# Altium PCB GNT604PWRR4.PCBDOC
Units mm, origin at the board's own origin, x right, y up, seen from the top; angles counter-clockwise.
Board outline 63 x 65.47 mm, 2 copper layers (Top Layer, Bottom Layer); 38 components, 26 nets, 112 pads, 11 vias.
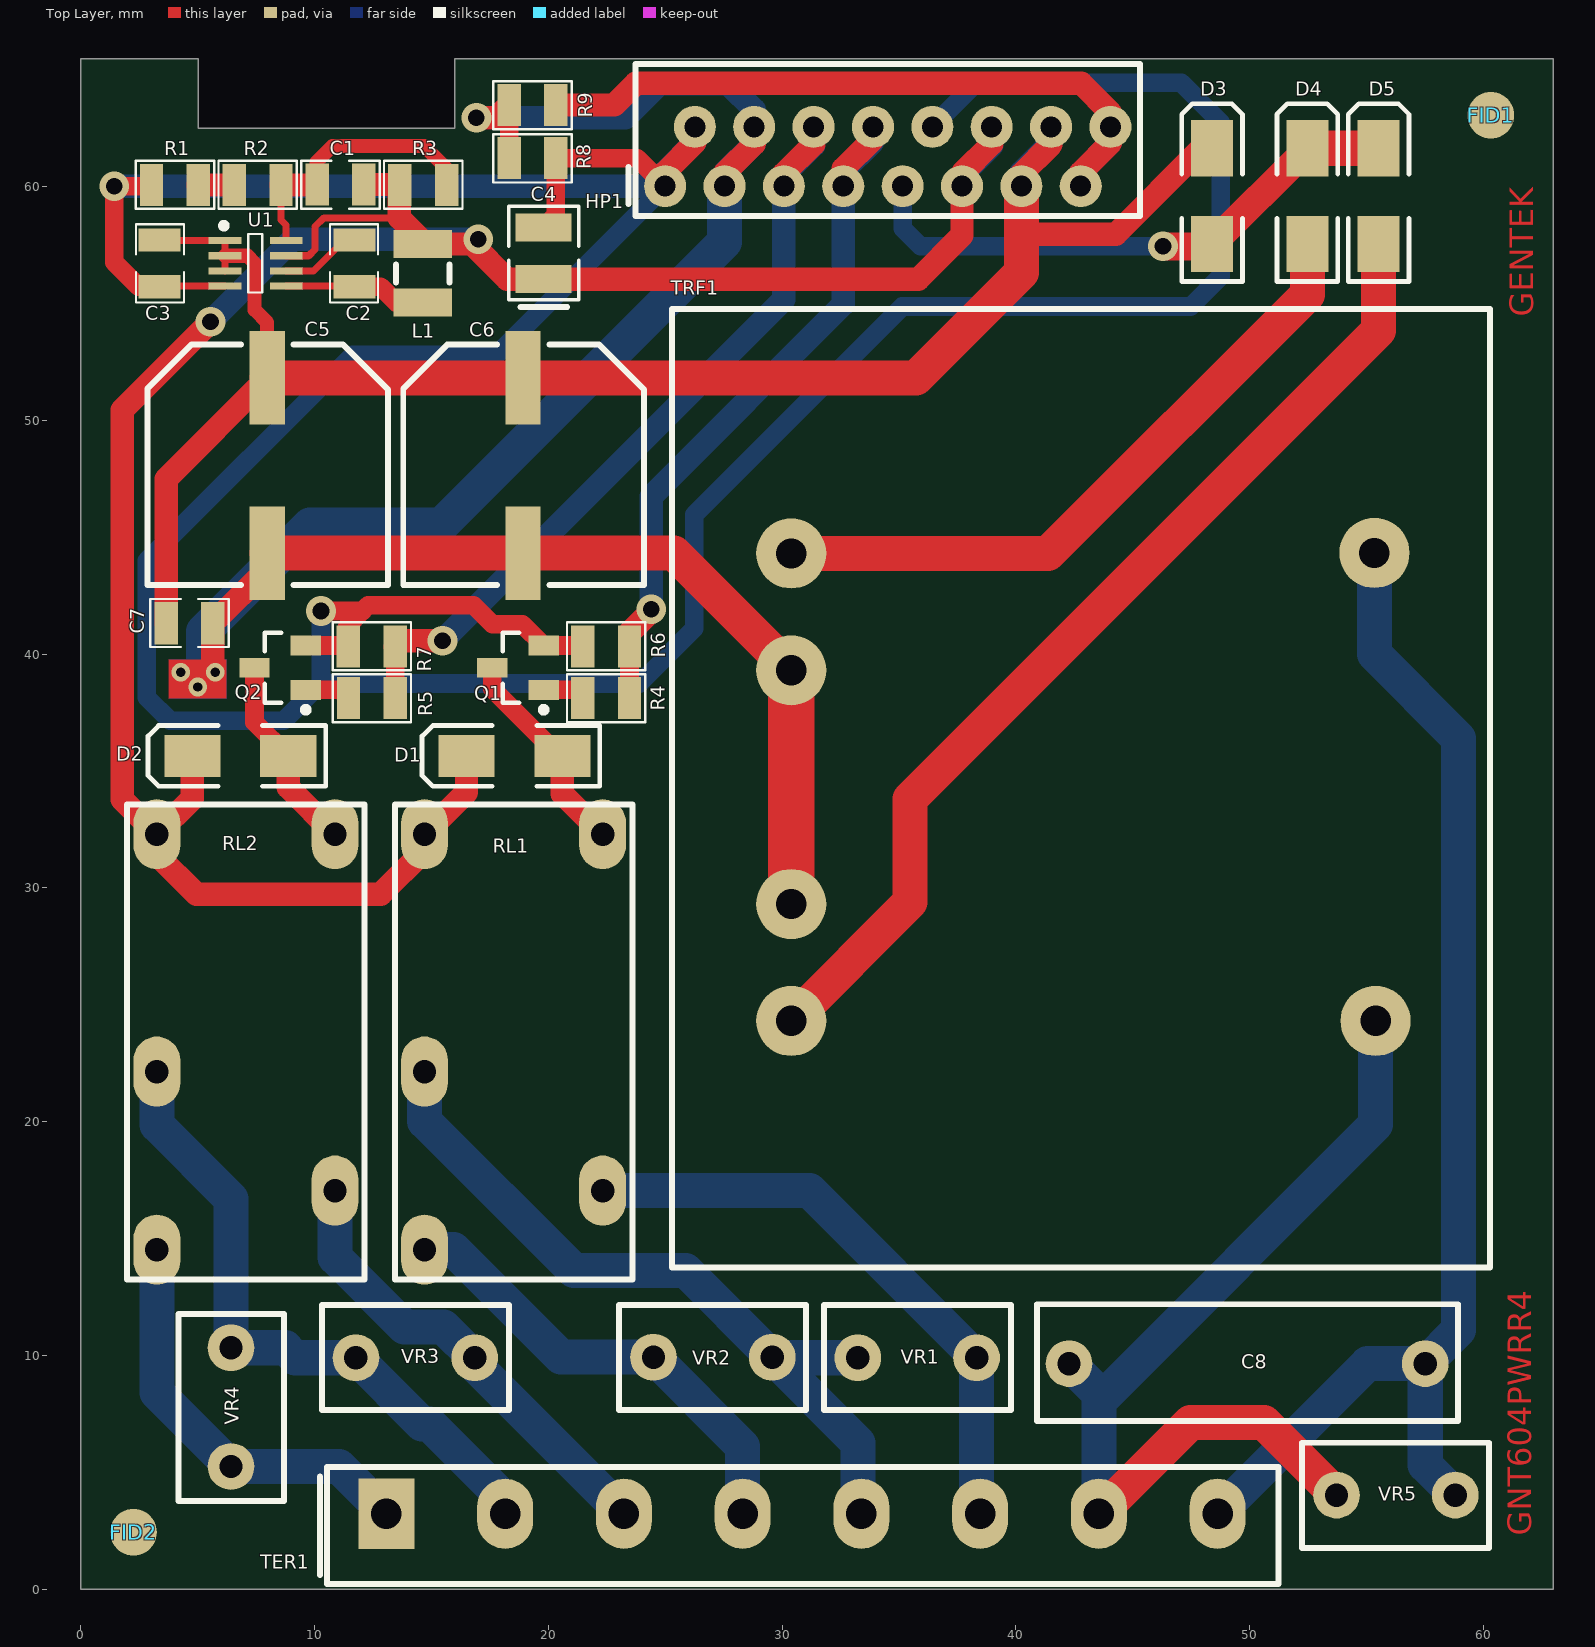
[diagram p0: Top Layer view]
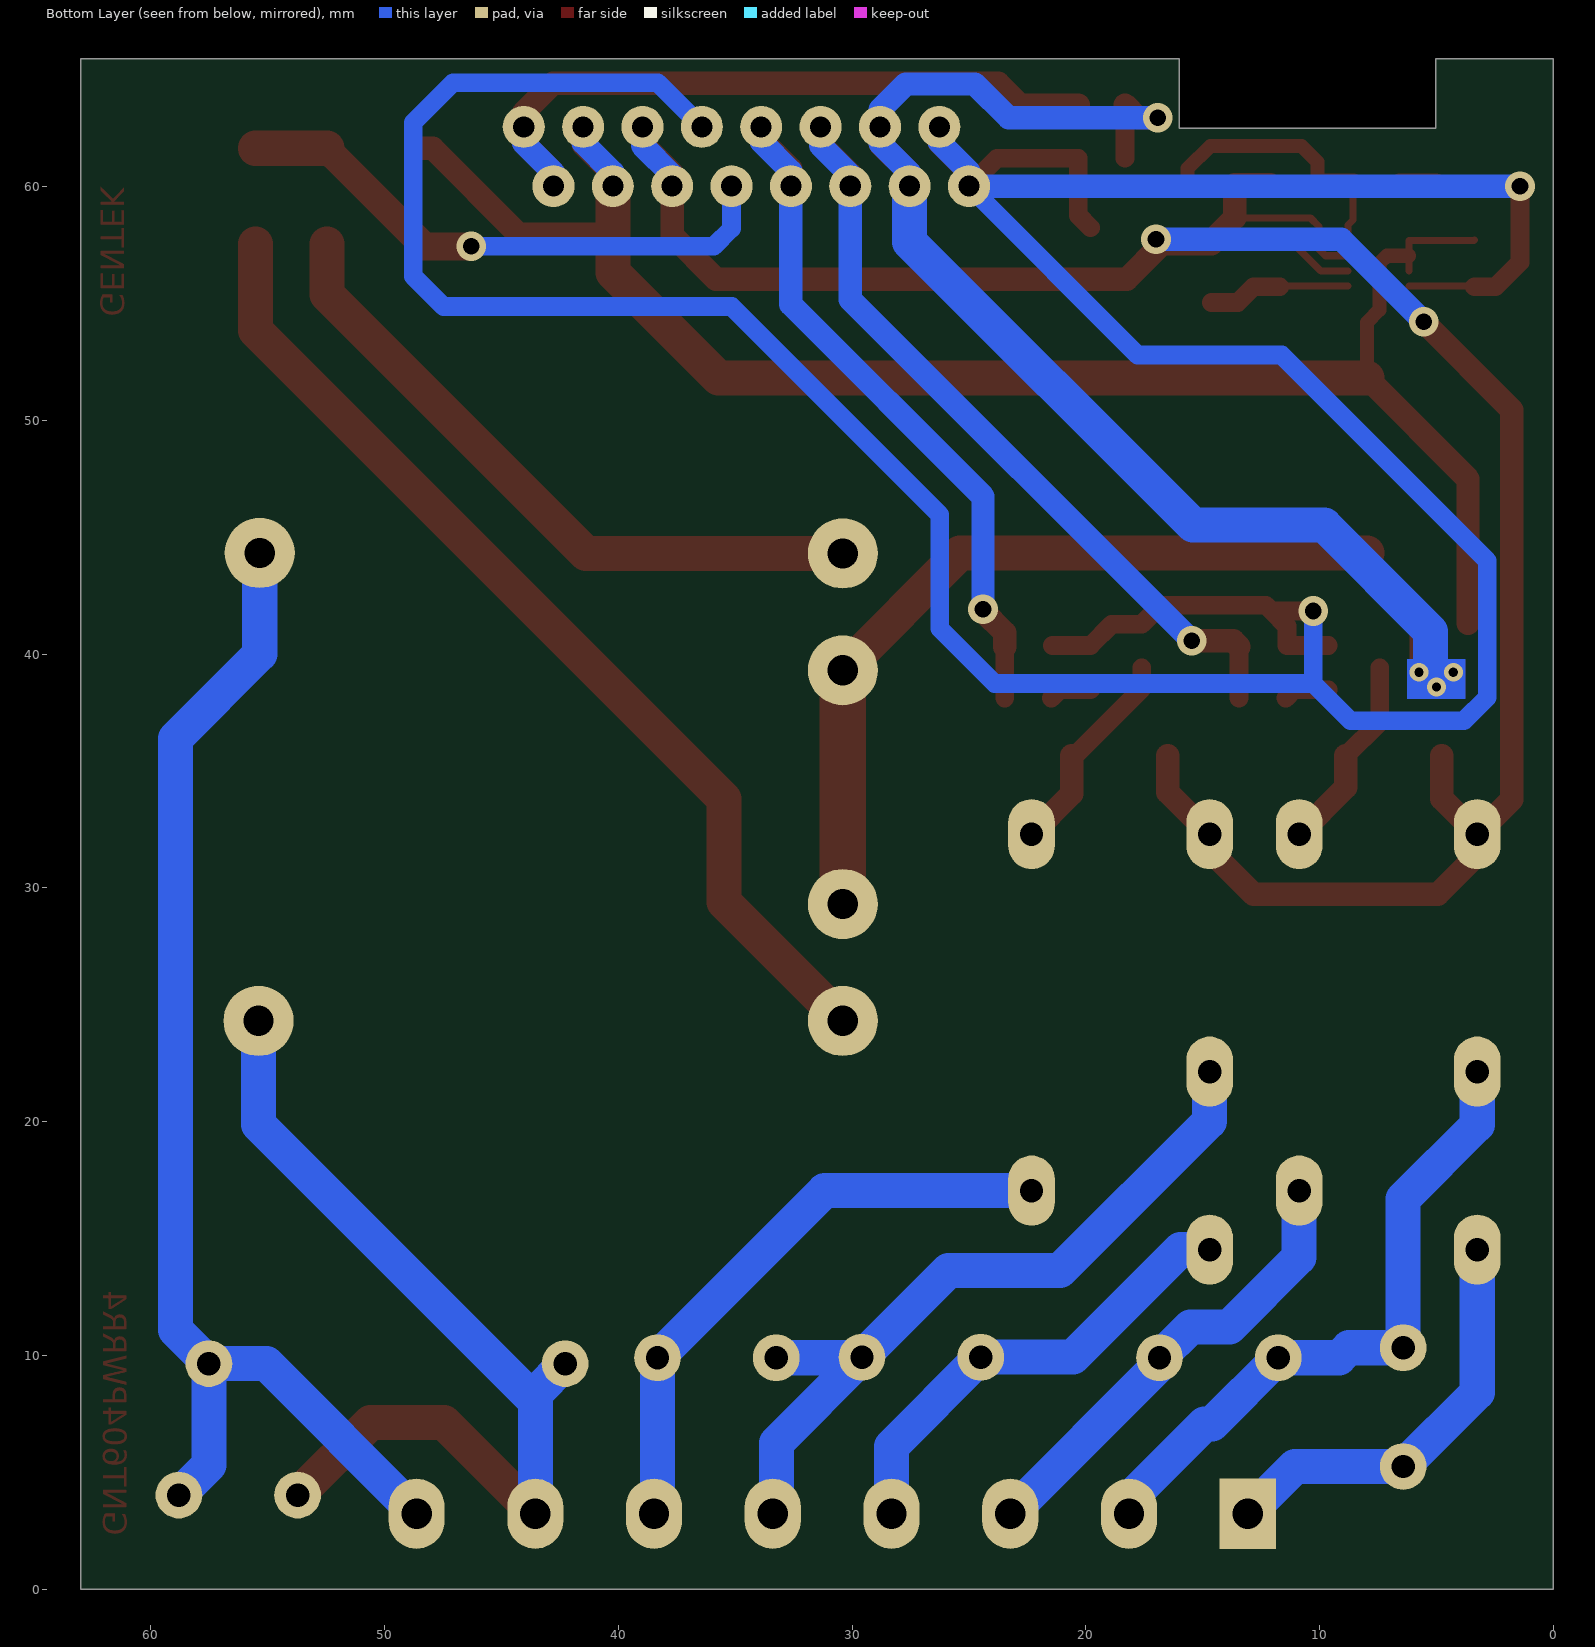
[diagram p1: Bottom Layer view, seen from below]

## Layer stack, top to bottom
Top Layer: signal copper 0.0356
Dielectric: dielectric 0.32, FR-4, Dk 4.8
Bottom Layer: signal copper 0.0356

## Board outline
0,0 63,0 63,65.475 16,65.475 16,62.5 5.025,62.5 5.025,65.475 0,65.475

## Design rules (kind name [scope] priority, off if disabled: settings)
Clearance [All] p1: gap=0.2
ComponentClearance [All] p1 off: gap=0.254 collisioncheckmode=3 verticalgap=0.254 showdistances=FALSE
FabricationTestPointUsage TestPointUsage [All] p1: valid=0 allowmultiple=FALSE
FabricationTestpoint Testpoint [All] p1: side=3 testpointundercomponent=TRUE minsize=1.016 maxsize=2.54 preferedsize=1.524 minholesize=0 maxholesize=1.016 preferedholesize=0.813 testpointgrid=0.025 allowsidetop=TRUE allowsidebottom=TRUE usegrid=TRUE gridtolerance=0
PolygonConnect [All] p1: connectstyle=Relief reliefconductorwidth=0.254 reliefentries=4 polygonreliefangle="90 Angle" airgapwidth=0.254
RoutingVias [All] p1: holewidth=0.4 width=0.8 viastyle="Through Hole" minholewidth=0.4 minwidth=0.8 maxholewidth=0.4 maxwidth=0.8
SilkToSolderMaskClearance SilkscreenOverComponentPads [IsPad] p1: minsilkscreentomaskgap=0.254 clearancetoexposedcopper=TRUE
SolderMaskExpansion [All] p1: expansion=0.102
Width [All] p1: maxlimit=3 minlimit=0.254 preferedwidth=0.3 minimp=50.000000 maximp=50.000000 favimp=50.000000
24 further rules are at their usual default settings.

## Classes and differential pairs
component class GNT604PWRR3: C1 C2 C3 C4 C5 C6 D1 D2 D3 D5 FID1 FID2 HP1 KL1 KL2 L1 Q1 Q2 R1 R2 R3 R6 R7 R8 R9 RL1 RL2 TER1 TRF1 U1 U? VR1 VR2 VR3 VR4 VR5

## Components (designator, comment, footprint, x,y, rotation, side; value= is the part's Value field where it differs from the comment)
C1 "47pF" CC0805 11.108,60.1 r0 top
C2 "470nF" CC0805 11.7,56.725 r270 top
C3 "100nF" CC0805 3.375,56.725 r90 top
C4 "47uF/10V" CAPSMDTANTAL-B 19.8,57.15 r90 top
C5 "470uF/25V" CAPSMD-10x10 7.975,51.825 r270 top
C6 "470uF/25V" CAPSMD-10x10 18.925,51.825 r270 top
C7 "100nF" CC0805 4.65,41.325 r180 top
C8 "100nF/275V/X2" CAPAXIAL/275V/X2 49.9,9.65 r180 top
D1 "US1M" CD-SMA_DO214 18.55,35.65 r180 top
D2 "US1M" CD-SMA_DO214 6.825,35.65 r180 top
D3 "M7" CD-SMA_DO214 48.4,59.6 r90 top
D4 "M7" CD-SMA_DO214 52.475,59.6 r90 top
D5 "M7" CD-SMA_DO214 55.525,59.6 r90 top
FID1 "FIDUCIAL1" FIDUCIAL1 60.325,63.05 r0 top
FID2 "FIDUCIAL1" FIDUCIAL1 2.25,2.425 r0 top
HP1 "DS1015-05_CONFLY" HeaderAntenk90Pin16 25,60.025 r0 top
L1 "47uH" INDC2.5X3.3 14.625,56.3 r90 top
Q1 "BC817" SOT23_N 18.75,39.425 r180 top
Q2 "BC817" SOT23_N 8.575,39.425 r180 top
R1 "120K" CR0805 4.025,60.075 r180 top
R2 "10K" CR0805 7.567,60.075 r180 top
R3 "390K" CR0805 14.65,60.075 r180 top
R4 "1K" CR0805 22.475,38.125 r0 top
R5 "1K" CR0805 12.45,38.125 r0 top
R6 "10K" CR0805 22.474,40.325 r180 top
R7 "10K" CR0805 12.449,40.325 r180 top
R8 "0R" CR0805 19.325,61.225 r0 top
R9 "0R" CR0805 19.325,63.5 r0 top
RL1 "NAIS_JQ1P-5V" NAIS_JQ1P-XXV 18.525,23.425 r270 top
RL2 "NAIS_JQ1P-5V" NAIS_JQ1P-XXV 7.075,23.425 r270 top
TER1 "Terminal_H5.08x8" Terminal_H5.08x8 13.075,3.225 r0 top
TRF1 "TRF-2X18-3.2VA" TRF-EI38/13,5 42.9,34.3 r180 top
U1 "LT3470ETS8" TS8_N 7.475,56.725 r0 top
VR1 "TVR07431" TVR07431 38.325,9.9 r180 top
VR2 "TVR07431" TVR07431 24.5,9.925 r0 top
VR3 "TVR07431" TVR07431 16.85,9.9 r180 top
VR4 "TVR07431" TVR07431 6.425,5.25 r90 top
VR5 "TVR07431" TVR07431 53.725,4.025 r0 top

## Footprints (in the part's own frame and the unit in brackets; to place one, negate y for a bottom-side part, rotate by r counter-clockwise, add the part's x,y. Pads: shape width x height; smd on the part's side, far side on the other; paste and mask are expansions set on the pad)
CAPAXIAL/275V/X2 [mm]
  round 2 hole 1: 1(-7.62,0) 2(7.62,0)
  silkscreen extent -9.02,-2.54 8.98,2.46, body extent -8.86,-2.39 8.84,2.31, height 2
CAPSMD-10x10 [mm]
  rect 4x1.5 smd: 1(0,0) 2(7.5,0)
  silkscreen extent -1.42,-5.13 8.86,5.17, body extent -1.17,-4.9 8.61,4.95, height 2
CAPSMDTANTAL-B [mm]
  rect 1.2x2.4 smd: 1(-1.1,0) 2(1.1,0)
  silkscreen extent -2.29,-1.5 2.01,1.5, body extent -1.82,-1.4 1.81,1.4, height 2
CC0805 [mm]
  rect 1x1.8 smd: 1(-1,0) 2(1,0)
  silkscreen extent -1.68,-1.04 1.68,1.01, body extent -1.12,-0.76 1.19,0.76, height 1
CD-SMA_DO214 [mm] "DO-214-AC/SMA; 2 C-Bend Leads; Body 5 x 2.7 mm, inc. leads (LxW)"
  rect 2.4x1.8 smd: 1(-2.05,0) 2(2.05,0)
  silkscreen extent -3.65,-1.3 3.95,1.3, body extent -2.69,-0.76 2.79,0.76, height 2
CR0805 [mm]
  rect 1x1.8 smd: 1(-1,0) 2(1,0)
  silkscreen extent -1.68,-1.04 1.68,1.02, body extent -1.17,-0.76 1.22,0.79, height 0.4
FIDUCIAL1 [mm]
  round 2 smd mask+1: 1(0.003,0.013)
HeaderAntenk90Pin16 [mm]
  round 1.8 hole 0.9: 1(0,0) 2(1.27,2.54) 3(2.54,0) 4(3.81,2.54) 5(5.08,0) 6(6.35,2.54) 7(7.62,0) 8(8.89,2.54) 9(10.16,0) 10(11.43,2.54) 11(12.7,0) 12(13.97,2.54) 13(15.24,0) 14(16.51,2.54) 15(17.78,0) 16(19.05,2.54)
  silkscreen extent -1.57,-1.27 20.32,5.23, body extent -1.02,-1.02 20.07,4.44, height 1
INDC2.5X3.3 [mm] "Chip Inductor, Body 4.5x1.6mm, IPC Low Density"
  rect 1.2x2.5 smd: 1(-1.25,0) 2(1.25,0)
  silkscreen extent -0.39,-1.14 0.38,1.14, body extent -1.86,-1.27 1.85,1.27, height 1.8
NAIS_JQ1P-XXV [mm]
  oval 3x2 hole 1: 1(1.28,-3.821) 2(6.373,3.799) 3(8.9,-3.821) 4(-8.88,-3.821) 5(-8.88,3.799)
  silkscreen extent -10.15,-5.09 10.17,5.07, body extent -10.01,-4.95 10.03,4.93, height 1.75
SOT23_N [mm] "SOT23, 3-Leads, Body 2.9x1.3mm, Pitch 0.95mm, Lead Span 2.3mm, IPC Medium Density"
  rect 1.3x0.85 smd: 1(-1.05,0.95) 2(-1.05,-0.95) 3(1.143,0)
  silkscreen extent -1.18,-1.5 0.7,1.92, body extent -0.7,-1.5 0.7,1.5, height 1.14
Terminal_H5.08x8 [mm]
  rect 2.4x3 hole 1.3: 1(0,0)
  oval 2.4x3 hole 1.3: 2(5.08,0) 3(10.16,0) 4(15.24,0) 5(20.32,0) 6(25.4,0) 7(30.48,0) 8(35.56,0)
  silkscreen extent -2.85,-3 38.18,2, body extent -2.37,-2.82 38,1.83, height 2
TRF-EI38/13,5 [mm]
  round 3 hole 1.3: 1(-12.496,9.988) 2(-12.446,-10.033) 3(12.504,-10.012) 4(12.504,-5.012) 6(12.504,4.988) 7(12.504,9.988)
  silkscreen extent -17.4,-20.47 17.6,20.53, body extent -17.15,-20.19 17.4,20.32, height 13
TS8_N [mm] "SOT23, 5-Leads, Body 3x1.6mm, Pitch 0.95mm, Lead Span 2.8mm, IPC Medium Density"
  rect 1.4x0.3 smd: 1(-1.31,0.975) 2(-1.31,0.325) 3(-1.31,-0.325) 4(-1.31,-0.975) 5(1.31,-0.975) 6(1.31,-0.325) 7(1.31,0.325) 8(1.31,0.975)
  silkscreen extent -1.48,-1.25 0.28,1.73, body extent -0.76,-1.44 0.74,1.46, height 1.45
TVR07431 [mm]
  round 2 hole 1: 1(0,0) 2(5.08,0)
  silkscreen extent -1.47,-2.26 6.53,2.24, body extent -1.32,-2.11 6.38,2.08, height 2

## Part data
C1 C2 C3 C7: library part CC-0805, "Ceramic Chip Capacitor - Standard"
C4: library part CAPSMDTANTAL-B, "CA45 Chip Tantalum Capacitors"
C5 C6: library part CAPSMD10x10, "Polarized Capacitor (SMD)"
C8: library part "CAP AXIAL SER", "Ceramic Capacitor - Standard"
D1 D2: "ChipDiodeSMA, ultra fast diode"
D3 D4 D5: library part CD-SMA_DO214, "ChipDiodeSMA"
HP1: library part "Header Antenk90PinF16", "Header, 16-Pin, 90 DEGREES"
L1: library part "Inductor Iron_47uH", "Magnetic-Core Inductor_SMD"
Q1 Q2: library part BC817-40, "NPN General Purpose Amplifier"
R1 R2 R3 R4 R5 R6 R7 R8 R9: library part CR-0805, "ChipResistor0805"
RL1 RL2: library part NAIS_JQ1P-24V, "Single-Pole Dual-Throw Relay"
TER1: "Terminal Block Horizontal 5.08mm 8 pin"
U1: "200mA, Micropower Buck Regulator"
VR1 VR2 VR3 VR4 VR5: "Varistor (Voltage-Sensitive Resistor)-275V"

## Via types
v1: diameter 1.27, hole 0.711, Top Layer to Bottom Layer, 8 vias
v2: diameter 0.8, hole 0.4, Top Layer to Bottom Layer, 3 vias

## Nets (pads, with @x,y where several pads share a name; then routed paths per layer and width w, separated by ;. In a path a pad name is that pad's centre, name@x,y a point inside that pad or via, vN(x,y) a via of type N, cw(c..) or ccw(c..) an arc to the next point about the centre after c; other vN are vias at no path point)
+5VDD: C1.2 C4.1 D1.2 D2.2 HP1.11 HP1.12 L1.2 R3.2 RL1.4 RL2.4 U1.7 | length 102.9
  Top Layer w0.3: U1.7 9.75,57.05 10.025,57.325 10.025,58.3 10.4,58.675 13.625,58.675
  Top Layer w1: D2.2 4.775,33.825 RL2.4 ; v1(5.55,54.225) 1.775,50.45 1.775,33.784 RL2.4 ; C1.2 13.625,60.1 13.625,58.675 14.625,57.675 L1.2 16.75,57.55 18.25,56.05 C4.1 35.825,56.05 37.7,57.925 HP1.11 37.7,60.57 38.97,61.84 HP1.12 ; D1.2 16.5,34.1 RL1.4 14.704,31.604 12.825,29.725 4.95,29.725 3.254,31.421 RL2.4
  Bottom Layer w1: v1(5.55,54.225) 9.075,57.75 v1(17,57.75) ; HP1.11 37.7,60.5 38.97,61.77 HP1.12
+18V: C3.2 C5.1 C6.1 C7.2 D3.2 HP1.13 HP1.14 U1.1 U1.2 U1.3 | length 76.6
  Top Layer w0.3: C3.2 3.4,57.7 U1.1 U1.2 U1.3
  Top Layer w0.6: U1.2 7.125,57.05 7.432,56.743 7.432,54.743 ; 7.432,54.725 7.432,54.743 ; C5.1 7.975,54.2 7.432,54.743
  Top Layer w1: C7.2 3.65,47.5 C5.1 ; 40.24,58.525 40.79,57.975 44.275,57.975 47.95,61.65 D3.2 ; HP1.13 40.24,60.54 41.51,61.81 HP1.14@41.51,62.38
  Top Layer w1.5: C5.1 C6.1 35.725,51.825 40.24,56.34 40.24,58.525 HP1.13
  Bottom Layer w1: HP1.13 40.24,60.615 41.51,61.885 HP1.14
DGND: C5.2 C6.2 C7.1 HP1.3 HP1.4 R8.1 R9.1 TRF1.4 TRF1.6 | length 98.7
  Top Layer w0.8: C5.2@7.975,43.65 C5.2 ; R8.1 R9.1
  Top Layer w1: v2@5.675,38.9 5.475,38.9 5.25,39.125 5.65,39.525 C7.1 C5.2@7.975,43.65 ; v1(16.925,62.95) 17.775,62.95 R9.1 ; HP1.3 27.54,60.575 28.81,61.845 HP1.4
  Top Layer w1.5: C5.2 C6.2 25.384,44.325 TRF1.4
  Top Layer w2: TRF1.6 TRF1.4
  Bottom Layer w1: v1(16.925,62.95) 23.3,62.95 24.75,64.4 27.7,64.4 28.81,63.29 HP1.4 28.81,61.86 27.54,60.59 HP1.3
  Bottom Layer w1.5: v2@5.25,38.9 5.25,39.125 5.25,40.975 9.8,45.525 15.425,45.525 27.54,57.64 HP1.3
  other v2: 5,38.6 4.275,39.225 5.75,39.225
GND: C3.1 C4.2 HP1.1 HP1.2 HP1.10 Q1.2 Q2.2 R1.2 R6.2 R7.2 R8.2 U1.4 | length 178.9
  Top Layer w0.3: C3.1 3.4,55.75 U1.4
  Top Layer w0.8: R1.2 2.975,60.025 v1(1.425,60.025) 1.425,56.775 2.475,55.725 C3.1 ; Q2.2 11.399,40.375 11.399,41.199 12.05,41.85 ; v1(10.275,41.85) 12.05,41.85 ; C4.2 20.325,58.775 R8.2 23.8,61.225 HP1.1 ; R6.2@21.424,40.375 Q1.2 18.887,41.287 17.613,41.287 16.8,42.1 12.3,42.1 12.05,41.85
  Top Layer w1: HP1.1 25,60.625 26.27,61.895 HP1.2
  Bottom Layer w0.8: v1(10.275,41.85) 10.275,38.75 ; HP1.1 17.775,52.8 11.625,52.8 2.825,44 2.825,38.15 3.825,37.15 8.675,37.15 10.275,38.75 ; HP1.10 38.315,64.45 47.075,64.45 48.775,62.75 48.775,56.175 47.475,54.875 35.15,54.875 26.25,45.975 26.25,41.1 23.9,38.75 10.275,38.75
  Bottom Layer w1: v1(1.425,60.025) HP1.1 25,60.65 26.27,61.92 HP1.2
NetC1_1: C1.1 R2.1 R3.1 U1.8 | length 11.9
  Top Layer w0.3: R2.1 8.567,58.583 8.785,58.365 U1.8
  Top Layer w0.6: C1.1@10.083,60.075 10.083,61.058 10.775,61.75 14.675,61.75 15.65,60.775 R3.1
  Top Layer w1: R2.1 C1.1@10.083,60.075
NetC2_1: C2.1 U1.6 | length 3.5
  Top Layer w0.3: U1.6 9.95,56.4 11.275,57.725 C2.1
NetC2_2: C2.2 L1.1 U1.5 | length 6.1
  Top Layer w0.3: U1.5 11.675,55.75 C2.2
  Top Layer w0.8: C2.2 12.825,55.725 13.5,55.05 L1.1
NetC8_1: C8.1 TER1.8 TRF1.2 VR5.2 | length 54.5
  Bottom Layer w1.5: TER1.8 55.06,9.65 C8.1 ; TRF1.2 55.346,40.004 58.95,36.4 58.95,11.08 C8.1 ; VR5.2 57.52,5.31 C8.1
NetC8_2: C8.2 TER1.7 TRF1.1 VR5.1 | length 41.2
  Top Layer w1.5: TER1.7 47.468,7.137 50.612,7.137 VR5.1
  Bottom Layer w1.5: C8.2 43.555,8.375 43.555,8.03 ; TER1.7 43.555,8.03 ; TRF1.1 55.396,19.871 43.555,8.03
NetD1_1: D1.1 Q1.3 RL1.5 | length 9.1
  Top Layer w0.8: Q1.3 17.607,38.518 20.475,35.65 D1.1
  Top Layer w1: D1.1 20.6,34.029 RL1.5
NetD2_1: D2.1 Q2.3 RL2.5 | length 8.5
  Top Layer w0.8: Q2.3 7.432,37.093 D2.1
  Top Layer w1: D2.1 8.875,34.304 RL2.5
NetD3_1: D3.1 D4.2 D5.2 HP1.9 | length 24.2
  Top Layer w1.2: v1(46.3,57.45) 48.3,57.45 D3.1 D4.2@52.475,61.625
  Top Layer w1.5: D4.2@52.475,61.625 D4.2 D5.2
  Bottom Layer w0.8: HP1.9 35.16,58.215 35.925,57.45 v1(46.3,57.45)
NetD4_1: D4.1 TRF1.3 | length 28.8
  Top Layer w1.5: TRF1.3 41.387,44.312 52.475,55.4 D4.1
NetD5_1: D5.1 TRF1.7 | length 43.6
  Top Layer w1.5: TRF1.7 35.475,29.391 35.475,33.8 55.525,53.85 D5.1
NetHP1_5: HP1.5 HP1.6 R5.2 R7.1 | length 36
  Top Layer w0.8: R5.2 R7.1@13.45,40.324
  Top Layer w1: R7.1@13.45,40.324 R7.1 13.699,40.575 v1(15.475,40.575) ; HP1.5 30.08,60.555 31.35,61.825 HP1.6
  Bottom Layer w1: v1(15.475,40.575) 30.08,55.18 HP1.5 30.08,60.505 31.35,61.775 HP1.6
NetHP1_7: HP1.7 HP1.8 R4.2 R6.1 | length 31.7
  Top Layer w0.8: R4.2 R6.1@23.475,40.324
  Top Layer w1: R6.1@23.475,40.324 R6.1 23.474,40.925 v1@24.4,41.851 ; HP1.7 32.62,60.77 33.89,62.04 HP1.8
  Bottom Layer w1: v1(24.4,41.925) 24.4,46.75 32.62,54.97 HP1.7 32.62,60.67 33.89,61.94 HP1.8
NetQ1_1: Q1.1 R4.1 | length 1.8
  Top Layer w0.8: Q1.1 21.125,38.475 R4.1
NetQ2_1: Q2.1 R5.1 | length 2
  Top Layer w0.8: Q2.1 11.1,38.475 R5.1
NetR1_1: R1.1 R2.2 | length 1.5
  Top Layer w1: R1.1 R2.2
NetRL1_1: RL1.1 TER1.5 VR1.2 VR2.2 | length 33.1
  Bottom Layer w1.5: RL1.1 14.704,20.021 21.1,13.625 25.88,13.625 VR2.2 VR2.2@29.605,9.9 ; VR1.2 VR2.2@29.605,9.9 ; TER1.5 33.245,3.375 33.245,6.26 VR2.2@29.605,9.9
NetRL1_2: RL1.2 TER1.6 VR1.1 | length 25.7
  Bottom Layer w1.5: RL1.2 31.173,17.052 VR1.1 38.325,3.375 TER1.6
NetRL1_3: RL1.3 TER1.4 VR2.1 | length 20
  Bottom Layer w1.5: RL1.3 15.95,14.525 20.55,9.925 VR2.1 28.315,6.11 TER1.4
NetRL2_1: RL2.1 TER1.2 VR3.2 VR4.2 | length 28.2
  Bottom Layer w1.5: RL2.1 3.254,19.871 6.425,16.7 VR4.2 8.745,10.33 9.175,9.9 VR3.2 14.595,7.075 14.925,7.075 18.155,3.845 TER1.2
NetRL2_2: RL2.2 TER1.3 VR3.1 | length 19.9
  Bottom Layer w1.5: RL2.2 10.874,14.201 13.85,11.225 15.525,11.225 VR3.1 16.85,9.61 TER1.3
NetRL2_3: RL2.3 TER1.1 VR4.1 | length 18.1
  Bottom Layer w1.5: RL2.3 3.254,8.421 VR4.1 11.05,5.25 TER1.1
PE: HP1.15 HP1.16 R9.2 | length 31.4
  Top Layer w1: R9.2 22.825,63.5 23.75,64.425 42.8,64.425 44.05,63.175 HP1.16 44.05,61.875 42.78,60.605 HP1.15
  Bottom Layer w1: HP1.15 42.78,60.605 44.05,61.875 HP1.16
pads on no net: FID1.1 FID2.1

## Other copper
Top Layer:
  rectangle net DGND: 3.75,38.1 6.225,39.775
  text "GENTEK" at 62.15,54.45 h1 r90
  text "GNT604PWRR4" at 62.05,2.275 h1 r90
Bottom Layer:
  rectangle net DGND: 3.75,38.075 6.25,39.8

## Silkscreen, mask and mechanical layers (free items; w line width, h text height)
Mechanical 4:
  lines w0.254: 0,0 63,0 63,65.5 16,65.5 16,62.5 5,62.5 5,65.5 0,65.5 0,0